# Altium PCB flight controller.PcbDoc (part 3 of 3)
Units mm, origin at the board's own origin, x right, y up, seen from the top; angles counter-clockwise.
Board outline 45 x 47 mm, 6 copper layers (Top Layer, GND Layer, PWR Layer, Layer 4, Layer 5, Bottom Layer), stack 1.786 mm thick; 82 components, 123 nets, 711 pads, 295 vias.
Unrouted connection lines stored in the file: 14.
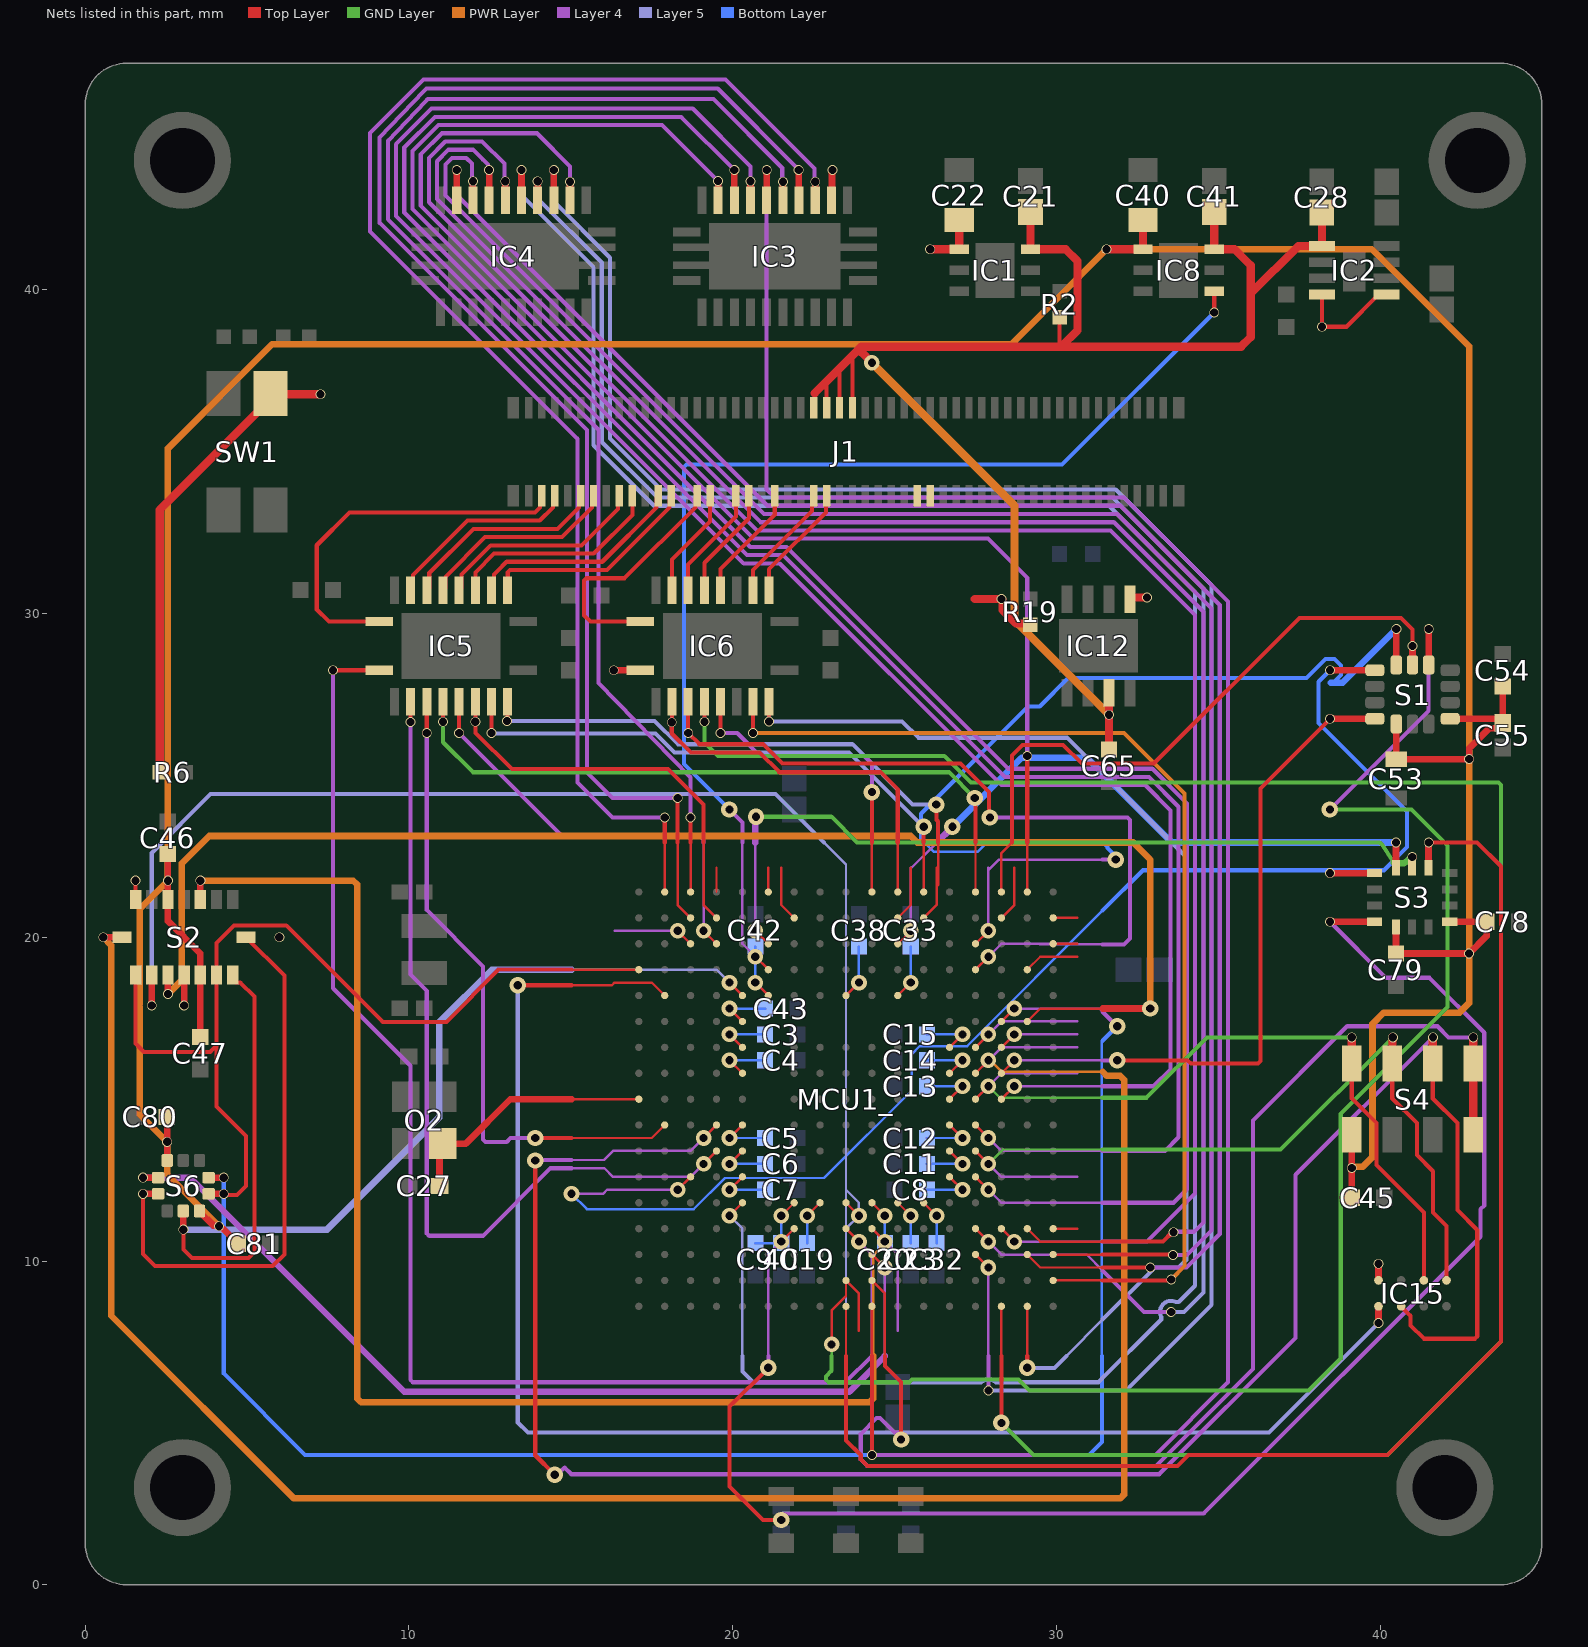
[diagram p6: the nets of this part, all layers, seen from the top]

## Via types
v1: diameter 0.483, hole 0.254, Top Layer to Layer 4, 88 vias
v2: diameter 0.305, hole 0.254, Top Layer to Layer 5, 60 vias
v3: diameter 0.305, hole 0.254, Top Layer to PWR Layer, 28 vias
v4: diameter 0.483, hole 0.254, Top Layer to Bottom Layer, 27 vias
v5: diameter 0.483, hole 0.254, Top Layer to GND Layer, 26 vias
v6: diameter 0.305, hole 0.254, Top Layer to Bottom Layer, 14 vias
v7: diameter 0.483, hole 0.254, Top Layer to Layer 5, 12 vias
v8: diameter 0.508, hole 0.254, Top Layer to Layer 4, 11 vias
v9: diameter 0.305, hole 0.254, Top Layer to Layer 4, 9 vias
v10: diameter 0.508, hole 0.254, Top Layer to Bottom Layer, 6 vias
v11: diameter 0.483, hole 0.254, Top Layer to PWR Layer, 6 vias
v12: diameter 0.508, hole 0.254, Top Layer to Layer 5, 4 vias
v13: diameter 0.508, hole 0.254, Top Layer to GND Layer, 3 vias
v14: diameter 0.508, hole 0.254, Top Layer to PWR Layer, 1 vias

## Nets (pads, with @x,y where several pads share a name; then routed paths per layer and width w, separated by ;. In a path a pad name is that pad's centre, name@x,y a point inside that pad or via, vN(x,y) a via of type N, cw(c..) or ccw(c..) an arc to the next point about the centre after c; other vN are vias at no path point) (continued)
PH1_OSC_OUT: C27.1 MCU1_.J1 O2.1 | length 8
  Top Layer w0.076: 15.021,15 16.352,15 16.726,15 MCU1_.J1@17.1,15
  Top Layer w0.203: C27.1@10.943,12.319 10.943,13.527 O2.1@11.043,13.627 11.758,13.627 13.131,15 15.021,15
SPI1_DRDY_ICM45686: MCU1_.P7 S3.4 | length 50.7
  Top Layer w0.076: v1(21.5,10.6) MCU1_.P7@21.9,11
  Top Layer w0.127: v8(21.1,6.701) 19.9,5.501 19.9,3.035 20.935,2 v8(21.5,2)
  Top Layer w0.203: v2(38.45,20.481) S3.4@39.828,20.481
  Layer 4 w0.076: 21.1,7.071 21.1,8.537 ; 21.1,7.852 21.1,8.537 ; v1(21.5,10.6) 21.1,10.2 21.1,8.537
  Layer 4 w0.127: v8(21.1,6.701) 21.1,7.071 ; v8(21.5,2) 21.554,2.054 21.554,2.2 34.55,2.2 43.1,10.75 43.1,11.6 43.218,11.718 43.218,17.052 41.52,18.749 40.181,18.749 v2(38.45,20.481)
SPI1_MISO: MCU1_.B7 S3.1 | length 3.1
  Top Layer w0.076: 21.5,22.148 21.5,21 MCU1_.B7@21.9,20.6
  Top Layer w0.203: v2(38.45,21.981) S3.1@39.828,21.981
SPI1_MOSI: MCU1_.C11 S3.14 | length 20.8
  Top Layer w0.076: MCU1_.C11@25.1,19.8 v1(25.5,20.2)
  Top Layer w0.203: S3.14@40.49,22.143 v6(40.49,22.929)
  Layer 4 w0.076: v1(25.5,20.2) 25.5,22.075 ; 25.5,22.148 25.5,22.075 ; 26.306,22.929 25.5,22.123 25.5,22.075
  Layer 4 w0.203: 26.306,22.929 v10(26.789,23.412)
  Bottom Layer w0.203: v10(26.789,23.412) 28.924,25.547 30.944,25.547 33.562,22.929 v6(40.49,22.929)
SPI1_nCS_ICM45686: MCU1_.U9 S3.12 | length 45.1
  Top Layer w0.076: 23.5,7.071 MCU1_.U9@23.5,8.6 23.5,7.852
  Top Layer w0.127: 23.5,7.071 23.5,4.457 23.957,4 23.957,3.869 24.158,3.668 33.742,3.668 34.085,4.011 40.226,4.011 43.729,7.514 43.729,22.194 42.995,22.929 v2(41.5,22.929)
  Top Layer w0.203: S3.12@41.49,22.143 41.495,22.148 41.495,22.924 v2(41.5,22.929)
SPI1_SCK: MCU1_.C6 S3.13 | length 26.4
  Top Layer w0.076: v1(20.7,20.2) MCU1_.C6@21.1,19.8
  Top Layer w0.203: S3.13@40.99,22.143 v2(40.99,22.481)
  Layer 4 w0.076: v1(20.7,20.2) 20.7,21.174 ; 20.7,22.148 20.7,21.174 ; 20.7,22.929 20.7,21.174
  Layer 4 w0.203: 20.7,22.929 20.7,23.705 v8(20.72,23.725)
  GND Layer w0.127: v8(20.72,23.725) 23.045,23.725 23.841,22.929 31.429,22.929 39.972,22.929 40.016,22.906 40.067,22.855 40.419,22.311
  GND Layer w0.203: 40.419,22.311 40.649,22.281 40.732,22.281 v2(40.99,22.481)
SPI2_DRDY_ICM42688P: MCU1_.H15 S1.4 | length 21.2
  Top Layer w0.076: MCU1_.H15@28.3,15.8 v1(28.7,16.2)
  Top Layer w0.127: v8(31.877,16.2) 34.053,16.2 34.153,16.1 36.226,16.1 36.3,16.174 36.3,24.6 v6(38.45,26.75)
  Top Layer w0.203: v6(38.45,26.75) S1.4@39.835,26.75
  Layer 4 w0.076: v1(28.7,16.2) 30.575,16.2 ; 30.648,16.2 30.575,16.2 ; 31.429,16.2 30.575,16.2
  Layer 4 w0.127: 31.429,16.2 v8(31.877,16.2)
SPI2_MISO: MCU1_.M3 S1.1 | length 43.3
  Top Layer w0.076: v1(18.3,12.2) MCU1_.M3@18.7,12.6
  Top Layer w0.203: v6(38.45,28.25) S1.1@39.835,28.25
  Layer 4 w0.076: v4(15.021,12.075) 15.998,12.075 16.123,12.2 16.352,12.2 16.425,12.2 v1(18.3,12.2)
  Bottom Layer w0.076: v4(15.021,12.075) 15.495,11.601 18.798,11.601 19.761,12.564 22.826,12.564 25.536,15.274 25.536,16.397 25.774,16.636 27.239,16.636 31.429,20.826
  Bottom Layer w0.127: 31.429,20.826 32.674,22.071 40.117,22.071 40.632,22.586 40.833,22.787 40.833,23.071 40.833,23.882 38.095,26.62 38.095,27.895 v6(38.45,28.25)
SPI2_MOSI: MCU1_.C14 S1.14 | length 33.5
  Top Layer w0.076: MCU1_.C14@27.5,19.8 v1(27.9,20.2)
  Top Layer w0.203: S1.14@40.5,28.415 v6(40.5,29.525)
  Layer 4 w0.076: v1(27.9,20.2) 27.9,22.075 ; 27.9,22.148 27.9,22.075 ; 31.429,22.4 28.225,22.4 27.9,22.075
  Layer 4 w0.127: 31.429,22.4 v10(31.83,22.4)
  Bottom Layer w0.076: 25.925,22.929 26.217,22.637 27.564,22.637 27.856,22.929
  Bottom Layer w0.127: 25.925,22.929 25.814,23.039 25.814,23.817 29.126,27.129 29.486,27.129 30.364,28.008 37.723,28.008 38.308,28.593 38.592,28.593 38.793,28.392 38.793,28.108 38.592,27.907 38.52,27.907 38.482,27.869 ; 27.856,22.929 27.895,22.967 31.391,22.967 31.574,22.784 31.574,22.759 31.83,22.503 v10(31.83,22.4)
  Bottom Layer w0.203: 38.482,27.869 38.844,27.869 v6(40.5,29.525)
SPI2_nCS_ICM42688P: MCU1_.T9 S1.12 | length 50.8
  Top Layer w0.076: v5(23.056,7.425) 23.056,8.476 23.5,8.921 MCU1_.T9@23.5,9.4 23.9,9 23.9,7.852
  Top Layer w0.203: S1.12@41.5,28.415 v6(41.5,29.525)
  Layer 4 w0.127: v8(38.45,23.948) 41.5,26.997 v6(41.5,29.525)
  GND Layer w0.076: 23.056,7.071 v5(23.056,7.425)
  GND Layer w0.127: 23.056,7.071 23.056,6.612 22.88,6.436 22.88,6.331 22.954,6.256 25.455,6.256 25.541,6.343 28.829,6.343 29.172,6 37.791,6 38.782,6.991 38.782,14.545 42.081,17.844 42.081,22.833 40.966,23.948 v8(38.45,23.948)
SPI2_SCK: MCU1_.A15 S1.13 | length 20.2
  Top Layer w0.076: MCU1_.A15@28.3,21.4 28.3,22.075 28.3,22.6 28.629,22.929
  Top Layer w0.127: 28.629,22.929 28.629,25.614 28.958,25.943 30.207,25.943 30.786,25.364 33.006,25.364 37.51,29.868 40.642,29.868 41,29.51 v6(41,29)
  Top Layer w0.203: S1.13@41,28.415 v6(41,29)
SPI4_DRDY_BMI088_ACCEL1: MCU1_.H14 S2.16 | length 66.8
  Top Layer w0.076: MCU1_.H14@27.5,15.8 v1(27.9,16.2)
  Top Layer w0.203: v2(0.554,20) S2.16@1.14,20
  Layer 4 w0.076: v1(27.9,16.2) 28.3,16.6 30.648,16.6
  PWR Layer w0.076: v1(27.9,16.2) 27.961,16.2 28.317,15.844 31.429,15.844
  PWR Layer w0.203: v2(0.554,20) 0.805,19.75 0.805,8.308 6.446,2.667 31.973,2.667 32.092,2.786 32.092,15.598 31.973,15.717 31.556,15.717 31.429,15.844
SPI4_DRDY_BMI088_ACCEL2: MCU1_.G14 S2.1 | length 4.1
  Top Layer w0.076: MCU1_.G14@27.5,16.6 v1(27.9,17)
  Top Layer w0.127: S2.1@1.554,21.165 v2(1.554,21.75)
  Layer 4 w0.076: v1(27.9,17) 28.3,17.4 30.648,17.4
SPI4_DRDY_BMI088_GYRO1: MCU1_.G15 S2.12 | length 3.5
  Top Layer w0.076: MCU1_.G15@28.3,16.6 v1(28.7,17)
  Top Layer w0.203: v2(3.055,17.89) S2.12@3.055,18.835
  Layer 4 w0.076: v1(28.7,17) 30.648,17
SPI4_DRDY_BMI088_GYRO2: MCU1_.F16 S2.13 | length 44
  Top Layer w0.076: MCU1_.F16@29.1,17.4 29.5,17.8 30.575,17.8 ; 30.648,17.8 30.575,17.8 ; 31.429,17.8 30.575,17.8
  Top Layer w0.203: v2(2.554,18.25) S2.13@2.554,18.835 ; 31.429,17.8 v14(32.9,17.8)
  PWR Layer w0.203: v2(2.554,18.25) 2.985,18.681 2.985,22.285 3.83,23.13 25.499,23.13 25.7,22.929 32.371,22.929 32.9,22.4 v14(32.9,17.8)
SPI4_DRDY_ICP20100: MCU1_.F15 S6.7 | length 51.9
  Top Layer w0.076: MCU1_.F15@28.3,17.4 v1(28.7,17.8)
  Top Layer w0.203: S6.7@3.81,12.575 v6(4.28,12.575)
  Layer 4 w0.076: v1(28.7,17.8) 30.575,17.8 ; 30.648,17.8 30.575,17.8 ; 31.429,17.701 31.33,17.8 30.575,17.8
  Layer 4 w0.127: 31.429,17.701 v10(31.877,17.253)
  Bottom Layer w0.076: 31.402,7.071 31.402,16.778 31.429,16.805
  Bottom Layer w0.127: v6(4.28,12.575) 4.28,6.52 6.789,4.011 31.001,4.011 31.402,4.413 31.402,7.071 ; 31.429,16.805 v10(31.877,17.253)
SPI4_MISO: MCU1_.D1 S2.10 S2.15 S6.6 | length 29.1
  Top Layer w0.076: 15.021,19 16.352,19 16.425,19 MCU1_.D1@17.1,19
  Top Layer w0.127: S2.15@1.554,18.835 1.554,16.719 1.819,16.455 3.859,16.455 4.06,16.655 4.06,14.775 4.97,13.865 4.97,12.319 4.691,12.041 4.313,12.041 v2(4.28,12.075) ; S2.10@4.055,18.835 4.055,19.824 4.596,20.365 6.209,20.365 9.191,17.384 11.153,17.384 12.769,19 15.021,19 ; 4.06,16.66 S2.10@4.06,18.83
  Top Layer w0.203: S6.6@3.81,12.075 v2(4.28,12.075)
SPI4_MOSI: MCU1_.E5 S2.9 S6.4 | length 35.1
  Top Layer w0.076: v7(19.9,18.6) MCU1_.E5@20.3,18.2
  Top Layer w0.127: v2(3.03,10.969) 3.03,10.359 3.294,10.095 5.044,10.095 5.224,10.274 5.224,18.166 4.786,18.603 4.666,18.603 4.554,18.715 S2.9@4.554,18.835
  Top Layer w0.203: v2(3.03,10.969) 3.03,11.197 S6.4@3.03,11.545
  Layer 5 w0.076: 15.021,19 16.352,19 17.162,19 19.5,19 v7(19.9,18.6)
  Layer 5 w0.203: v2(3.03,10.969) 7.469,10.969 10.93,14.43 10.93,17.372 12.558,19 15.021,19
SPI4_nCS_BMI088_ACCEL: MCU1_.N9 S2.14 | length 45.3
  Top Layer w0.076: MCU1_.N9@23.5,11.8 v7(23.9,11.4)
  Top Layer w0.203: v2(2.055,17.89) S2.14@2.055,18.835
  Layer 5 w0.076: 22.816,22.929 23.5,22.245 23.5,12.2 ; 23.5,7.852 23.5,11 ; 23.5,11 v7(23.9,11.4) 23.9,11.8 23.5,12.2 ; 23.5,11 23.5,12.2
  Layer 5 w0.127: v2(2.055,17.89) 2.055,22.607 3.872,24.425 21.32,24.425 22.816,22.929
SPI4_nCS_BMI088_GYRO: MCU1_.P10 S2.5 | length 45.9
  Top Layer w0.076: MCU1_.P10@24.3,11 v1(24.7,10.6)
  Top Layer w0.203: S2.5@3.554,21.165 v2(3.554,21.75)
  Layer 4 w0.076: v1(24.7,10.6) 25.1,10.2 25.1,7.852
  PWR Layer w0.076: 24.344,7.071 24.344,10.183 24.7,10.539 v1(24.7,10.6)
  PWR Layer w0.203: v2(3.554,21.75) 8.281,21.75 8.4,21.631 8.4,5.754 8.519,5.635 24.225,5.635 24.344,5.754 24.344,7.071
SPI4_nCS_ICP20100: MCU1_.R10 S6.1 | length 30
  Top Layer w0.076: MCU1_.R10@24.3,10.2 v1(24.7,9.8)
  Top Layer w0.203: v2(1.78,12.575) S6.1@2.25,12.575
  Layer 4 w0.076: 24.7,7.071 24.7,7.925 ; 24.7,7.852 24.7,7.925 ; v1(24.7,9.8) 24.7,7.925
  Layer 4 w0.203: v2(1.78,12.575) 3.241,12.575 9.852,5.964 23.606,5.964 24.7,7.058 24.7,7.071
SPI4_SCK: MCU1_.C3 S2.8 S6.2 | length 19.8
  Top Layer w0.076: v1(18.3,20.2) MCU1_.C3@18.7,19.8
  Top Layer w0.127: v2(1.78,12.075) 1.78,10.216 2.155,9.841 5.79,9.841 6.156,10.206 6.156,18.814 S2.8@4.97,20
  Top Layer w0.203: v2(1.78,12.075) S6.2@2.25,12.075
  Layer 4 w0.076: 16.352,20.2 v1(18.3,20.2)
  other v2: 5.995,20
SPI5_MISO: IC15.4 MCU1_.K4 S4.6 | length 65.6
  Top Layer w0.076: v1(19.1,13.8) MCU1_.K4@19.5,14.2
  Top Layer w0.127: v8(13.9,13.105) 13.9,4 v8(14.5,3.4) ; IC15.4@40.65,8.6 40.942,8.308 40.942,8.008 41.35,7.6 42.926,7.6 43,7.674 43,10.956 42.384,11.572 42.384,14.26 41.625,15.019 S4.6@41.625,16.1
  Top Layer w0.254: S4.6@41.625,16.1 41.628,16.104 41.628,16.906 v2(41.632,16.91)
  Layer 4 w0.076: 15.021,13.121 16.023,13.121 16.302,13.4 17.778,13.4 ; 16.856,13.4 17.778,13.4 ; v1(19.1,13.8) 18.7,13.4 17.778,13.4
  Layer 4 w0.127: v8(13.9,13.105) 13.916,13.121 15.021,13.121 ; v8(14.5,3.4) 14.595,3.4 14.811,3.615 15.012,3.414 33.176,3.414 37.387,7.625 37.387,12.665 v2(41.632,16.91)
SPI5_MOSI: IC15.7 MCU1_.L14 S4.7 | length 25.8
  Top Layer w0.076: MCU1_.L14@27.5,13.4 v1(27.9,13)
  Top Layer w0.127: S4.7@40.375,16.1 40.375,15.019 41.135,14.26 41.135,13.271 41.632,12.774 41.632,11.498 42.05,11.08 IC15.7@42.05,9.4
  Top Layer w0.254: S4.7@40.375,16.1 40.384,16.109 40.384,16.901 v2(40.393,16.91)
  Layer 4 w0.076: v1(27.9,13) 28.3,12.6 30.648,12.6
  GND Layer w0.076: v1(27.9,13) 28.344,13.444 31.429,13.444
  GND Layer w0.127: 31.429,13.444 36.927,13.444 v2(40.393,16.91)
SPI5_nCS_EEPROM: IC15.2 MCU1_.E2 | length 46.9
  Top Layer w0.076: 15.021,18.517 16.27,18.517 16.352,18.6 16.926,18.6 17.5,18.6 MCU1_.E2@17.9,18.2
  Top Layer w0.127: v12(13.361,18.517) 15.021,18.517
  Top Layer w0.203: v2(39.95,8.085) 39.95,8.313 IC15.2@39.95,8.6
  Layer 5 w0.127: v12(13.361,18.517) 13.361,5.014 13.674,4.7 36.565,4.7 v2(39.95,8.085)
SPI5_nCS_MS5611: MCU1_.T10 S4.4 S4.5 | length 40.2
  Top Layer w0.076: MCU1_.T10@24.3,9.4 24.7,9 24.7,8.426 24.7,7.852 24.7,7.071
  Top Layer w0.127: 24.7,7.071 24.7,6.758 25.2,6.258 v8(25.2,4.486)
  Top Layer w0.254: S4.4@42.875,13.9 S4.5@42.875,16.1 v2(42.875,16.91)
  Layer 4 w0.127: v8(25.2,4.486) 25.16,4.526 25.16,4.7 25,4.7 24.553,5.147 24.447,5.147 23.957,4.657 23.957,3.869 24.158,3.668 33.071,3.668 36.071,6.668 36.071,14.341 38.983,17.253 41.774,17.253 42.117,16.91 v2(42.875,16.91)
SPI5_SCK: IC15.5 MCU1_.J14 S4.8 | length 24.1
  Top Layer w0.076: MCU1_.J14@27.5,15 v1(27.9,15.4)
  Top Layer w0.127: S4.8@39.125,16.1 39.125,15.019 39.885,14.26 39.885,12.964 41.35,11.498 IC15.5@41.35,9.4
  Top Layer w0.254: S4.8@39.125,16.1 v2(39.125,16.91)
  Layer 4 w0.076: v1(27.9,15.4) 28.3,15.8 30.648,15.8
  GND Layer w0.076: v1(27.9,15.4) 28.256,15.044 31.429,15.044
  GND Layer w0.127: 31.429,15.044 32.782,15.044 34.647,16.91 v2(39.125,16.91)
TIM1_CH1: IC3.8 MCU1_.J15 | length 60.5
  Top Layer w0.076: MCU1_.J15@28.3,15 v1(28.7,15.4)
  Top Layer w0.203: IC3.8@20.55,42.765 v2(20.55,43.356)
  Layer 4 w0.076: v1(28.7,15.4) 30.575,15.4 30.648,15.4 31.429,15.4
  Layer 4 w0.127: v2(20.55,43.356) 20.55,43.816 18.766,45.6 10.7,45.6 9.6,44.5 9.6,42.286 20.34,31.546 21.454,31.546 28.3,24.7 32.744,24.7 33.522,23.922 33.522,15.915 33.007,15.4 31.429,15.4
TIM1_CH2: IC3.9 MCU1_.K14 | length 62.7
  Top Layer w0.076: MCU1_.K14@27.5,14.2 v1(27.9,13.8)
  Top Layer w0.203: IC3.9@20.05,42.765 v2(20.05,43.705)
  Layer 4 w0.076: v1(27.9,13.8) 28.3,13.4 29.963,13.4 30.648,13.4 31.429,13.4
  Layer 4 w0.127: v2(20.05,43.705) 18.409,45.346 10.805,45.346 9.854,44.395 9.854,42.391 20.438,31.807 21.552,31.807 28.405,24.954 32.855,24.954 33.776,24.033 33.776,13.823 33.353,13.4 31.429,13.4
TIM1_CH3: IC3.10 MCU1_.M14 | length 63.4
  Top Layer w0.076: MCU1_.M14@27.5,12.6 v1(27.9,12.2)
  Top Layer w0.203: v2(19.547,43.36) 19.549,43.359 19.549,42.766 IC3.10@19.55,42.765
  Layer 4 w0.076: v1(27.9,12.2) 28.3,11.8 29.963,11.8 30.648,11.8 31.429,11.8
  Layer 4 w0.127: v2(19.547,43.36) 17.815,45.092 10.91,45.092 10.108,44.29 10.108,42.496 20.543,32.061 21.657,32.061 28.51,25.208 32.96,25.208 34.03,24.138 34.03,12.217 33.613,11.8 31.429,11.8
TIM1_CH4: IC3.7 MCU1_.U10 | length 67.1
  Top Layer w0.076: 24.3,7.071 24.3,7.852 24.3,8.226 MCU1_.U10@24.3,8.6
  Top Layer w0.127: v9(24.3,4.011) 24.3,7.071
  Top Layer w0.203: IC3.7@21.05,42.765 v2(21.05,43.705)
  Layer 4 w0.127: v2(21.05,43.705) 21.05,33.835 21.3,33.585 32.087,33.585 35.3,30.372 35.3,6.256 33.055,4.011 v9(24.3,4.011)
TIM4_CH1: IC4.10 MCU1_.R16 | length 56.5
  Top Layer w0.076: MCU1_.R16@29.1,10.2 29.5,9.8 30.074,9.8 30.648,9.8 31.429,9.8
  Top Layer w0.127: 31.429,9.8 v9(32.9,9.8)
  Top Layer w0.203: IC4.10@11.475,42.765 v2(11.475,43.705)
  Layer 4 w0.127: v2(11.475,43.705) 11.475,42.925 21.069,33.331 31.982,33.331 35.046,30.267 35.046,10.833 34.013,9.8 v9(32.9,9.8)
TIM4_CH2: IC4.9 MCU1_.R17 | length 56.5
  Top Layer w0.076: MCU1_.R17@29.9,10.2 30.274,10.2 30.648,10.2 31.429,10.2
  Top Layer w0.127: 31.429,10.2 33.583,10.2 v9(33.6,10.183)
  Top Layer w0.203: IC4.9@11.975,42.765 v2(11.975,43.356)
  Layer 4 w0.127: v2(11.975,43.356) 11.945,43.386 11.945,43.9 11.769,44.076 11.331,44.076 11.124,43.869 11.124,42.917 20.964,33.077 31.877,33.077 34.792,30.162 34.792,10.938 34.037,10.183 v9(33.6,10.183)
TIM4_CH3: IC4.8 MCU1_.P16 | length 57.9
  Top Layer w0.076: MCU1_.P16@29.1,11 29.5,10.6 30.161,10.6 30.648,10.6 31.429,10.6
  Top Layer w0.127: 31.429,10.6 33.29,10.6 33.578,10.888 v9(33.618,10.888)
  Top Layer w0.203: IC4.8@12.475,42.765 v2(12.475,43.705)
  Layer 4 w0.127: v2(12.475,43.705) 12.441,43.739 12.441,43.871 12.275,44.036 11.982,44.33 11.226,44.33 10.87,43.974 10.87,42.812 20.859,32.823 31.772,32.823 34.538,30.057 34.538,11.192 34.249,10.903 33.632,10.903 v9(33.618,10.888)
TIM4_CH4: IC4.7 MCU1_.P15 | length 58.9
  Top Layer w0.076: MCU1_.P15@28.3,11 v1(28.7,10.6)
  Top Layer w0.203: IC4.7@12.975,42.765 v2(12.975,43.356)
  Layer 4 w0.076: v1(28.7,10.6) 29.674,10.6 30.648,10.6 31.429,10.6
  Layer 4 w0.127: v2(12.975,43.356) 12.945,43.386 12.945,43.9 12.261,44.584 11.121,44.584 10.616,44.079 10.616,42.706 20.753,32.569 31.667,32.569 34.284,29.952 34.284,12.084 32.8,10.6 31.429,10.6
TIM5_CH1: IC4.6 MCU1_.N5 | length 75.6
  Top Layer w0.076: v7(19.9,11.4) MCU1_.N5@20.3,11.8
  Top Layer w0.203: IC4.6@13.475,42.765 v2(13.475,43.705)
  Layer 5 w0.076: v7(19.9,11.4) 20.3,11 20.3,9.177 ; 20.3,7.071 20.3,7.852 ; 20.3,7.852 20.3,9.177 ; 20.3,7.852 20.3,9.177
  Layer 5 w0.127: v2(13.475,43.705) 13.475,42.925 15.7,40.7 15.7,35.2 17.569,33.331 31.623,33.331 34.284,30.67 34.284,9.237 33.78,8.732 33.727,8.732 33.699,8.732 ; 20.3,7.071 20.3,6.581 20.625,6.256 27.672,6.256 cw(c27.9,6) 28.128,6.256 31.304,6.256 33.238,8.191 33.238,8.243 33.238,8.271 cw(c33.544,8.426) 33.699,8.732 ; 33.238,8.271 cw(c33.544,8.426) 33.699,8.732
TIM5_CH2: IC4.5 MCU1_.P14 | length 60
  Top Layer w0.076: MCU1_.P14@27.5,11 v1(27.9,10.6)
  Top Layer w0.203: IC4.5@13.975,42.765 v2(13.975,43.356)
  Layer 4 w0.076: v1(27.9,10.6) 28.3,10.2 29.474,10.2 30.585,10.2 30.648,10.2 30.936,10.2 31.429,9.707
  Layer 4 w0.127: 31.429,9.707 32.71,8.426 v2(33.544,8.426)
  Layer 5 w0.127: v2(13.975,43.356) 13.975,42.825 15.954,40.846 15.954,35.305 17.674,33.585 31.728,33.585 34.538,30.775 34.538,9.023 33.941,8.426 v2(33.544,8.426)
TIM5_CH3: IC4.4 MCU1_.R14 | length 65.6
  Top Layer w0.076: MCU1_.R14@27.5,10.2 v1(27.9,9.8)
  Top Layer w0.203: IC4.4@14.475,42.765 v2(14.475,43.705)
  Layer 4 w0.076: 27.9,7.071 27.9,8.426 ; 27.9,7.852 27.9,8.426 ; v1(27.9,9.8) 27.9,8.426
  Layer 4 w0.127: v2(27.9,6) 27.9,7.071
  Layer 5 w0.127: v2(14.475,43.705) 14.475,42.725 16.208,40.992 16.208,35.41 17.779,33.839 31.833,33.839 34.792,30.88 34.792,8.648 32.144,6 v2(27.9,6)
TIM5_CH4: IC4.3 MCU1_.A16 | length 41.5
  Top Layer w0.076: MCU1_.A16@29.1,21.4 29.1,21.774 ; 29.1,22.929 29.1,22.148 ; 29.1,21.774 29.1,22.148 ; 29.1,21.774 29.1,22.148
  Top Layer w0.127: 29.1,22.929 v9(29.1,25.6)
  Top Layer w0.203: IC4.3@14.975,42.765 v2(14.975,43.339)
  Layer 4 w0.127: v2(14.975,43.339) 14.975,43.816 13.953,44.838 11.016,44.838 10.362,44.184 10.362,42.601 20.648,32.315 27.885,32.315 29.1,31.1 v9(29.1,25.6)
TIM8_CH1: IC3.6 MCU1_.A3 | length 41.7
  Top Layer w0.076: MCU1_.A3@18.7,21.4 18.7,21.774 18.7,22.075 18.7,22.148 18.7,22.929
  Top Layer w0.127: 18.7,22.929 v9(18.7,23.7)
  Top Layer w0.203: IC3.6@21.55,42.765 v2(21.55,43.339)
  Layer 4 w0.127: 14.847,36.68 9.346,42.18 9.346,44.605 10.505,45.818 10.579,45.892 19.402,45.892 21.531,43.763 v2@21.531,43.359 ; 14.848,36.678 15.847,35.68 15.854,35.665 15.854,27.861 18.7,24.943 v9(18.7,23.7)
  Layer 4 w0.203: v2@21.531,43.359 v2(21.55,43.339)
TIM8_CH2: IC3.4 MCU1_.A2 | length 44.7
  Top Layer w0.076: MCU1_.A2@17.9,21.4 17.9,21.774 17.9,22.148 17.9,22.929
  Top Layer w0.127: 17.9,22.929 v9(17.9,23.7)
  Top Layer w0.203: IC3.4@22.55,42.765 v2(22.55,43.339)
  Layer 4 w0.127: v9(17.9,23.7) 16.284,23.7 15.2,24.784 15.2,35.4 8.8,41.8 8.8,44.846 10.454,46.5 19.782,46.5 22.531,43.751 v2@22.531,43.359
  Layer 4 w0.203: v2@22.531,43.359 v2(22.55,43.339)
TIM8_CH3: IC3.5 MCU1_.B3 | length 44.9
  Top Layer w0.076: 18.3,22.929 18.3,22.148 18.3,21.774 18.3,21 MCU1_.B3@18.7,20.6
  Top Layer w0.127: 18.3,22.929 v9(18.3,24.302)
  Top Layer w0.203: v2@22.044,43.716 22.044,42.771 IC3.5@22.05,42.765
  Layer 4 w0.127: v9(18.3,24.302) 16.284,24.302 15.495,25.092 15.495,35.672 9.107,42.061 9.092,42.061 9.092,44.71 10.461,46.148 10.536,46.222 19.539,46.222 v2@22.038,43.723
  Layer 4 w0.203: v2(22.038,43.705) v2@22.038,43.723
TIM8_CH4: IC3.3 MCU1_.B15 | length 2.7
  Top Layer w0.076: MCU1_.B15@28.3,20.6 28.7,21 28.7,22.148
  Top Layer w0.203: IC3.3@23.05,42.765 23.067,42.782 23.067,43.707 v2@23.084,43.724
  other v2: 23.084,43.705
UART4_RX: J1.61 MCU1_.B17 | length 0.7
  Top Layer w0.076: MCU1_.B17@29.9,20.6 30.648,20.6
UART4_TX: J1.63 MCU1_.D16 | length 1.7
  Top Layer w0.076: MCU1_.D16@29.1,19 29.5,19.4 30.648,19.4
UART7_CTS: IC5.3 MCU1_.L4 | length 27.6
  Top Layer w0.076: v1(19.1,13) MCU1_.L4@19.5,13.4
  Top Layer w0.127: v2(10.044,26.647) 10.047,26.651 IC5.3@10.047,27.272
  Layer 4 w0.076: 15.021,12.867 16.035,12.867 16.302,12.6 17.038,12.6 ; 16.352,12.6 17.038,12.6 ; v1(19.1,13) 18.7,12.6 17.038,12.6
  Layer 4 w0.127: v2(10.044,26.647) 10.044,18.853 10.55,18.346 10.55,10.854 10.624,10.78 12.286,10.78 14.373,12.867 15.021,12.867
UART7_CTS_TELEM2: IC5.18 J1.5 | length 6.1
  Top Layer w0.127: IC5.18@10.05,30.725 10.126,30.801 10.126,31.188 11.809,32.871 14.04,32.871 14.449,33.279 14.449,33.594 J1.5@14.5,33.645
UART7_RTS: IC5.1 MCU1_.P9 | length 44
  Top Layer w0.076: MCU1_.P9@23.5,11 v1(23.9,10.6)
  Top Layer w0.127: v2(7.65,28.25) IC5.1@9.075,28.25
  Layer 4 w0.076: v1(23.9,10.6) 24.3,10.2 24.3,8.662 ; 24.3,7.071 24.3,8.662 ; 24.3,7.852 24.3,8.537 24.3,8.662
  Layer 4 w0.127: v2(7.65,28.25) 7.65,18.426 10.044,16.032 10.044,6.331 10.118,6.256 23.485,6.256 24.3,7.071
UART7_RTS_TELEM2: IC5.20 J1.3 | length 11.8
  Top Layer w0.127: IC5.20@9.075,29.75 7.524,29.75 7.15,30.124 7.15,32.111 8.164,33.125 13.894,33.125 14.049,33.279 14.049,33.594 J1.3@14.1,33.645
UART7_RX: IC5.4 MCU1_.K2 | length 21.2
  Top Layer w0.076: 15.021,13.8 16.926,13.8 ; MCU1_.K2@17.9,14.2 17.5,13.8 16.926,13.8 ; 16.926,13.8 16.352,13.8 16.926,13.8
  Top Layer w0.127: v2(10.55,26.308) IC5.4@10.55,27.275 ; v8(13.9,13.8) 15.021,13.8
  Layer 4 w0.127: v2(10.55,26.308) 10.55,20.839 12.286,19.102 12.286,13.756 12.361,13.681 13.019,13.681 13.138,13.8 v8(13.9,13.8)
UART7_RX_TELEM2: IC5.17 J1.9 | length 6.4
  Top Layer w0.127: IC5.17@10.55,30.725 10.627,30.801 10.627,31.255 11.988,32.617 14.586,32.617 15.248,33.279 15.248,33.594 J1.9@15.3,33.645
UART7_TX: IC5.5 MCU1_.A14 | length 21.3
  Top Layer w0.076: MCU1_.A14@27.5,21.4 27.5,21.774 27.5,22.148 27.5,22.929
  Top Layer w0.127: v2(11.05,26.657) IC5.5@11.05,27.275 ; v13(27.475,24.302) 27.5,24.277 27.5,22.929
  GND Layer w0.127: v2(11.05,26.657) 11.05,26.025 11.975,25.1 26.677,25.1 v13(27.475,24.302)
UART7_TX_TELEM2: IC5.16 J1.11 | length 6.2
  Top Layer w0.127: IC5.16@11.05,30.725 11.126,30.801 11.126,31.136 12.353,32.363 14.732,32.363 15.648,33.279 15.648,33.594 J1.11@15.7,33.645
UART8_RX: IC5.6 MCU1_.C4 | length 13.3
  Top Layer w0.076: v1(19.1,20.2) MCU1_.C4@19.5,19.8
  Top Layer w0.127: v2(11.55,26.308) IC5.6@11.55,27.275
  Layer 4 w0.076: v1(19.1,20.2) 19.1,22.929
  Layer 4 w0.127: v2(11.55,26.308) 14.758,23.1 19.026,23.1 19.1,23.026 19.1,22.929
UART8_RX_GPS2: IC5.15 J1.15 | length 6.6
  Top Layer w0.127: IC5.15@11.55,30.725 11.627,30.801 11.627,31.209 11.758,31.34 ; 11.758,31.342 12.525,32.109 15.329,32.109 16.453,33.232 16.453,33.598 J1.15@16.5,33.645
UART8_TX: IC5.7 MCU1_.B4 | length 13.2
  Top Layer w0.076: 19.1,22.148 19.1,21.574 ; 19.1,22.929 19.1,21.574 ; MCU1_.B4@19.5,20.6 19.1,21 19.1,21.574
  Top Layer w0.127: IC5.7@12.05,27.275 v2(12.05,26.657) 12.059,26.648 12.059,26.314 13.179,25.195 18.005,25.195 19.1,24.1 19.1,22.929
UART8_TX_GPS2: IC5.14 J1.17 | length 6.7
  Top Layer w0.127: IC5.14@12.05,30.725 12.05,31.274 12.63,31.855 15.708,31.855 16.9,33.047 J1.17@16.9,33.645
USART1_RX: IC6.4 MCU1_.D14 | length 26.2
  Top Layer w0.076: MCU1_.D14@27.5,19 v1(27.9,19.4)
  Top Layer w0.127: IC6.4@18.625,27.275 v2(18.625,26.308) 18.968,25.965 20.933,25.965 21.534,25.364 27.035,25.364 27.652,24.747 27.659,24.747 27.919,24.486 27.919,23.725 v8(27.944,23.7)
  Layer 4 w0.076: v1(27.9,19.4) 28.3,19.8 29.474,19.8 ; 30.648,19.8 29.474,19.8 ; 31.429,19.78 30.648,19.78 29.494,19.78 29.474,19.8
  Layer 4 w0.127: v8(27.944,23.7) 32.201,23.7 32.275,23.626 32.275,19.967 32.087,19.78 31.429,19.78
USART1_RX_GPS1: IC6.17 J1.33 | length 3.5
  Top Layer w0.127: IC6.17@18.625,30.725 18.625,31.521 20.1,32.996 J1.33@20.1,33.645
USART1_TX: IC6.5 MCU1_.U15 | length 65.2
  Top Layer w0.076: 28.3,7.071 MCU1_.U15@28.3,8.6 28.3,7.852
  Top Layer w0.127: v2(19.125,26.657) IC6.5@19.125,27.275 ; v13(28.3,5) 28.3,7.071
  GND Layer w0.127: v2(19.125,26.657) 19.125,26.022 19.547,25.6 26.537,25.6 27.357,24.78 43.655,24.78 43.729,24.705 43.729,7.514 40.226,4.011 29.289,4.011 v13(28.3,5)
USART1_TX_GPS1: IC6.16 J1.35 | length 3.5
  Top Layer w0.127: IC6.16@19.125,30.725 19.125,31.571 20.5,32.946 J1.35@20.5,33.645
USART2_CTS: IC5.9 MCU1_.B12 | length 19.2
  Top Layer w0.076: MCU1_.B12@25.9,20.6 26.3,21 26.3,21.574 ; 26.3,22.148 26.3,21.574 ; 26.344,22.929 26.344,21.618 26.3,21.574
  Top Layer w0.127: v2(13.029,26.685) 13.04,26.695 IC5.9@13.04,27.265 ; v12(26.287,24.1) 26.3,24.087 26.3,23.629 26.344,23.584 26.344,22.929
  Layer 5 w0.127: v2(13.029,26.685) 17.589,26.685 18.309,25.965 23.694,25.965 25.559,24.1 v12(26.287,24.1)
USART2_CTS_TELEM1: IC5.12 J1.23 | length 6.8
  Top Layer w0.127: IC5.12@13.05,30.725 13.05,31.272 13.124,31.347 16.116,31.347 18.048,33.279 18.048,33.594 J1.23@18.1,33.645
USART2_RTS: IC5.8 MCU1_.A12 | length 17.9
  Top Layer w0.076: MCU1_.A12@25.9,21.4 25.9,21.774 ; 25.9,22.148 25.9,21.774 ; 25.9,22.929 25.9,21.774
  Top Layer w0.127: v2(12.55,26.308) IC5.8@12.55,27.275 ; 25.9,22.929 v12(25.9,23.412)
  Layer 5 w0.127: v2(12.55,26.308) 12.558,26.3 17.615,26.3 18.204,25.711 23.589,25.711 25.888,23.412 v12(25.9,23.412)
USART2_RTS_TELEM1: IC5.13 J1.21 | length 6.8
  Top Layer w0.127: IC5.13@12.55,30.725 12.627,30.801 12.627,31.208 12.719,31.301 13.019,31.601 15.97,31.601 17.648,33.279 17.648,33.594 J1.21@17.7,33.645
USART2_RX: IC6.1 MCU1_.B11 | length 2.5
  Top Layer w0.076: MCU1_.B11@25.1,20.6 25.5,21 25.5,22.148
  Top Layer w0.203: v2(16.325,28.25) IC6.1@17.15,28.25
USART2_RX_TELEM1: IC6.20 J1.27 | length 7.7
  Top Layer w0.127: IC6.20@17.15,29.75 15.607,29.75 15.412,29.945 15.412,31.018 15.487,31.093 16.662,31.093 18.848,33.279 18.848,33.594 J1.27@18.9,33.645
USART2_TX: IC6.3 MCU1_.A11 | length 11.8
  Top Layer w0.076: MCU1_.A11@25.1,21.4 25.1,21.774 25.1,22.148 25.1,22.929
  Top Layer w0.127: IC6.3@18.125,27.275 18.12,27.27 18.12,26.648 v2(18.116,26.643) 18.116,26.304 18.709,25.711 20.828,25.711 21.439,25.1 24.559,25.1 25.1,24.559 25.1,22.929
USART2_TX_TELEM1: IC6.18 J1.29 | length 3.4
  Top Layer w0.127: IC6.18@18.125,30.725 18.125,31.671 19.3,32.846 J1.29@19.3,33.645
USART3_RX: IC6.8 MCU1_.T17 | length 33.9
  Top Layer w0.076: MCU1_.T17@29.9,9.4 30.274,9.4 30.648,9.4 31.429,9.4
  Top Layer w0.127: v2(20.625,26.308) IC6.8@20.625,27.275 ; 31.429,9.4 33.515,9.4 v9(33.547,9.432)
  PWR Layer w0.127: v2(20.625,26.308) 32.092,26.308 33.961,24.439 33.961,9.846 v9(33.547,9.432)
USART3_RX_DEBUG: IC6.13 J1.45 | length 3.7
  Top Layer w0.127: IC6.13@20.625,30.725 20.625,31.34 22.448,33.164 22.448,33.594 J1.45@22.5,33.645
USART3_TX: IC6.9 MCU1_.U16 | length 36.3
  Top Layer w0.076: 29.1,7.071 29.1,8.226 ; 29.1,7.852 29.1,8.226 ; MCU1_.U16@29.1,8.6 29.1,8.226
  Top Layer w0.127: v2(21.117,26.667) 21.121,26.671 21.121,27.271 IC6.9@21.125,27.275 ; v12(29.1,6.701) 29.1,7.071
  Layer 5 w0.076: 30.312,7.071 31.429,8.188
  Layer 5 w0.127: v2(21.117,26.667) 25.234,26.667 25.735,26.166 30.325,26.166 34.01,22.481 34.01,10.031 33.78,9.8 33.041,9.8 31.429,8.188 ; v12(29.1,6.701) 29.942,6.701 30.312,7.071
USART3_TX_DEBUG: IC6.12 J1.47 | length 3.7
  Top Layer w0.127: IC6.12@21.125,30.725 21.125,31.371 22.879,33.125 22.879,33.624 J1.47@22.9,33.645
USART6_RX: IC6.6 MCU1_.A10 | length 10.4
  Top Layer w0.076: MCU1_.A10@24.3,21.4 24.3,21.774 ; 24.3,22.148 24.3,21.774 ; 24.3,22.929 24.3,21.774
  Top Layer w0.127: v2(19.625,26.308) IC6.6@19.625,27.275 ; 24.3,22.929 v8(24.3,24.486)
  Layer 4 w0.127: v2(19.625,26.308) 20.14,26.308 20.848,25.6 24.059,25.6 24.3,25.359 v8(24.3,24.486)
USART6_RX_SBUS_DSM: IC6.15 J1.39 | length 3.6
  Top Layer w0.127: IC6.15@19.625,30.725 19.625,31.383 21.3,33.058 J1.39@21.3,33.645
VDD_3V3_SENSORS_EN: IC8.4 MCU1_.D6 | length 35.7
  Top Layer w0.076: v1(20.7,19.4) MCU1_.D6@21.1,19
  Top Layer w0.127: v6(34.875,39.305) IC8.4@34.875,39.955
  Layer 4 w0.076: 20.3,22.148 20.3,22.075 ; 20.3,22.929 20.3,22.075 ; v1(20.7,19.4) 20.3,19.8 20.3,22.075
  Layer 4 w0.127: v10(19.9,23.948) 20.3,23.548 20.3,22.929
  Bottom Layer w0.127: v10(19.9,23.948) 18.5,25.348 18.5,34.526 18.574,34.6 30.17,34.6 v6(34.875,39.305)
VDD_5V_IN: C21.1 C28.1 C41.1 C65.1 IC1.6 IC2.1 IC8.6 IC12.3 J1.46 J1.48 J1.50 J1.52 R2.2 | length 50.4
  Top Layer w0.076: 19.5,21.4 19.5,22.148
  Top Layer w0.127: J1.46@22.5,36.355 22.535,36.39 22.535,36.808 ; J1.48@22.9,36.355 22.9,37.173 ; J1.50@23.3,36.355 23.3,37.573 ; J1.52@23.7,36.355 23.7,37.973 ; R2.2@30.1,39.155 30.1,38.295 30.15,38.245
  Top Layer w0.254: 22.535,36.808 22.917,37.19 ; 22.9,37.173 22.917,37.19 ; v11(24.3,37.747) 23.972,38.074 23.972,38.245 ; C21.1@29.2,42.408 IC1.6@29.2,41.255 30.285,41.255 30.648,40.892 30.648,38.743 30.15,38.245 ; C65.1@31.625,25.805 v3(31.625,26.875) IC12.3@31.625,27.55 ; C41.1@34.875,42.408 IC8.6@34.875,41.255 35.505,41.255 36,40.76 36,39.883 ; C28.1@38.2,42.385 IC2.1@38.2,41.355 37.472,41.355 36,39.883 ; 22.917,37.19 23.3,37.573 23.7,37.973 23.887,38.16 23.972,38.245 ; 23.972,38.245 30.15,38.245 ; 30.15,38.245 35.708,38.245 36,38.537 36,39.883
  PWR Layer w0.254: v11(24.3,37.747) 28.706,33.34 28.706,29.794 v3(31.625,26.875)
VDD_MCU: 40.1 C3.1 C4.1 C5.1 C6.1 C7.1 C8.1 C9.1 C11.1 C12.1 C13.1 C14.1 C15.1 C19.1 C20.1 C22.1 C23.1 C32.1 C33.1 C38.1 C42.1 C43.1 IC1.1 IC2.4 IC2.5 IC12.5 IC15.1 MCU1_.A6 MCU1_.C17 MCU1_.E6 MCU1_.E9 MCU1_.E11 MCU1_.F5 MCU1_.G5 MCU1_.G13 MCU1_.H5 MCU1_.H13 MCU1_.J13 MCU1_.K5 MCU1_.K13 MCU1_.L5 MCU1_.L13 MCU1_.M5 MCU1_.M13 MCU1_.N7 MCU1_.N8 MCU1_.N10 MCU1_.N11 MCU1_.N12 MCU1_.P17 R6.2 R19.2 SW1.1 | length 58.2
  Top Layer w0.076: v4(19.9,12.2) MCU1_.M5@20.3,12.6 ; v4(19.9,13) MCU1_.L5@20.3,13.4 ; v4(19.9,13.8) MCU1_.K5@20.3,14.2 ; v4(19.9,16.2) MCU1_.H5@20.3,15.8 ; v4(19.9,17) MCU1_.G5@20.3,16.6 ; v4(19.9,17.8) MCU1_.F5@20.3,17.4 ; v4(20.7,18.6) MCU1_.E6@21.1,18.2 ; MCU1_.A6@21.1,21.4 21.1,22.148 ; v4(21.5,11.4) MCU1_.N7@21.9,11.8 ; v4(22.3,11.4) MCU1_.N8@22.7,11.8 ; MCU1_.E9@23.5,18.2 v4(23.9,18.6) ; MCU1_.N10@24.3,11.8 v4(24.7,11.4) ; MCU1_.N11@25.1,11.8 v4(25.5,11.4) ; MCU1_.E11@25.1,18.2 v4(25.5,18.6) ; MCU1_.N12@25.9,11.8 v4(26.3,11.4) ; MCU1_.M13@26.7,12.6 v4(27.1,12.2) ; MCU1_.L13@26.7,13.4 v4(27.1,13) ; MCU1_.K13@26.7,14.2 v4(27.1,13.8) ; MCU1_.J13@26.7,15 v4(27.1,15.4) ; MCU1_.H13@26.7,15.8 v4(27.1,16.2) ; MCU1_.G13@26.7,16.6 v4(27.1,17) ; MCU1_.P17@29.9,11 30.648,11 ; MCU1_.C17@29.9,19.8 30.648,19.8
  Top Layer w0.127: IC2.4@38.2,39.855 v3(38.2,38.861) 38.955,38.861 39.95,39.855 IC2.5@40.2,39.855
  Top Layer w0.203: IC15.1@39.95,9.4 v3(39.95,9.915)
  Top Layer w0.254: R6.2@2.3,25.092 2.3,33.2 5.725,36.625 SW1.1@5.725,36.8 5.749,36.776 v3(7.27,36.776) ; v3(26.1,41.255) IC1.1@27,41.255 C22.1@27,42.055 ; 27.475,30.45 v3(28.3,30.45) 28.334,30.416 28.334,30.112 28.755,29.69 29.155,29.69 R19.2@29.195,29.65 ; IC12.5@32.275,30.45 32.275,30.452 32.323,30.5 v3(32.8,30.5)
  Bottom Layer w0.076: v4(19.9,12.2) C7.1@21,12.2 ; v4(19.9,13) C6.1@21,13 ; v4(19.9,13.8) C5.1@21,13.8 ; v4(19.9,16.2) C4.1@21,16.2 ; v4(19.9,17) 20.995,17 C3.1@21,16.995 ; v4(19.9,17.8) C43.1@21,17.8 ; C9.1@20.7,10.552 40.1@21.5,10.552 v4(21.5,11.4) ; v4(20.7,18.6) C42.1@20.7,19.712 ; C19.1@22.3,10.552 v4(22.3,11.4) ; v4(23.9,18.6) C38.1@23.9,19.712 ; C20.1@24.7,10.552 v4(24.7,11.4) ; C23.1@25.5,10.552 v4(25.5,11.4) ; v4(25.5,18.6) C33.1@25.5,19.712 ; C8.1@26,12.2 v4(27.1,12.2) ; C11.1@26,13 v4(27.1,13) ; C12.1@26,13.8 v4(27.1,13.8) ; C13.1@26,15.4 v4(27.1,15.4) ; C14.1@26,16.2 v4(27.1,16.2) ; C15.1@26,17 v4(27.1,17) ; C32.1@26.3,10.552 v4(26.3,11.4)
VDD_SENSOR: C40.1 C45.1 C46.1 C47.1 C53.1 C54.1 C55.1 C78.1 C79.1 C80.1 C81.1 IC8.1 S1.5 S1.8 S2.3 S2.11 S3.5 S3.8 S4.1 S6.5 S6.10 | length 124.2
  Top Layer w0.203: C80.1@2.515,14.452 2.529,14.438 v3(2.529,13.681) S6.10@2.529,13.105 ; C46.1@2.546,22.575 2.55,22.571 2.55,21.754 v2(2.554,21.75) S2.3@2.554,21.165 2.554,20.5 3.554,19.5 S2.11@3.554,18.835 C47.1@3.554,16.919 ; S6.5@3.529,11.545 3.529,11.525 3.96,11.094 4.11,11.094 v3(4.129,11.075) 4.149,11.056 4.194,11.056 C81.1@4.715,10.535 ; C45.1@39.125,11.954 v3(39.125,12.875) S4.1@39.125,13.9 ; C79.1@40.49,19.5 v3(42.749,19.5) 43.289,20.039 C78.1@43.289,20.481 S3.8@42.153,20.481 ; C79.1@40.49,19.5 S3.5@40.49,20.318 ; S1.5@40.5,26.585 40.5,25.505 40.501,25.504 42.749,25.504 v3(42.75,25.505) 42.75,25.831 43.381,26.463 43.63,26.463 43.669,26.501 43.669,26.75 S1.8@42.165,26.75 ; C55.1@43.789,26.62 C54.1@43.789,27.75
  Top Layer w0.254: v3(31.55,41.255) IC8.1@32.675,41.255 C40.1@32.675,42.155
  PWR Layer w0.203: v3(4.129,11.075) 2.529,12.675 v3(2.529,13.681) 1.746,14.465 1.687,14.524 1.687,17.791 ; v3(39.125,12.875) 39.158,12.908 39.458,12.908 39.764,13.214 39.764,17.325 40.114,17.675 42.453,17.675 42.749,17.97 v3(42.749,19.5) ; v3(42.749,19.5) v3(42.75,25.505) ; v3(42.75,25.505) 42.75,38.25 39.745,41.255 v3(31.55,41.255) 28.619,38.324 5.779,38.324 2.554,35.1 v2(2.554,21.75) 1.687,20.882 1.687,17.988 ; 1.687,17.791 cw(c2.055,17.89) 1.687,17.988 ; 1.687,17.791 cw(c2.055,17.89) 1.687,17.988
pads on no net: IC1.2 IC1.3 IC2.6 IC3.26 IC3.27 IC3.28 IC3.29 IC4.26 IC4.27 IC4.28 IC4.29 IC6.7 IC6.14 IC8.2 IC8.3 IC15.3 J1.40 J1.41 J1.42 J1.43 J1.53 J1.54 J1.55 J1.56 J1.57 J1.58 J1.59 J1.60 J1.62 J1.64 J1.65 J1.66 J1.67 J1.68 J1.69 J1.70 J1.71 J1.72 J1.73 J1.74 J1.75 J1.76 J1.77 J1.78 J1.80 J1.82 J1.83 J1.84 J1.85 J1.86 J1.87 J1.88 J1.89 J1.90 J1.91 J1.92 J1.93 J1.94 J1.95 J1.96 J1.97 J1.98 J1.99 J1.100 J1.101 J1.102 J1.103 J1.104 MCU1_.A4 MCU1_.A5 MCU1_.A8 MCU1_.A9 MCU1_.A13 MCU1_.B1 MCU1_.B5 MCU1_.B8 MCU1_.B9 MCU1_.B10 MCU1_.B13 MCU1_.B16 MCU1_.C5 MCU1_.C7 MCU1_.C8 MCU1_.C9 MCU1_.C12 MCU1_.D2 MCU1_.D3 MCU1_.D4 MCU1_.D5 MCU1_.D7 MCU1_.D8 MCU1_.D9 MCU1_.D10 MCU1_.D11 MCU1_.D12 MCU1_.D15 MCU1_.E1 MCU1_.E3 MCU1_.E10 MCU1_.E13 MCU1_.E14 MCU1_.E15 MCU1_.E16 MCU1_.E17 MCU1_.F1 MCU1_.F3 MCU1_.F4 MCU1_.F13 MCU1_.F14 MCU1_.F17 MCU1_.G1 MCU1_.G2 MCU1_.G3 MCU1_.G4 MCU1_.G17 MCU1_.H1 MCU1_.H2 MCU1_.H3 MCU1_.H4 MCU1_.H16 MCU1_.H17 MCU1_.J4 MCU1_.J5 MCU1_.K1 MCU1_.K3 MCU1_.K16 MCU1_.K17 MCU1_.L1 MCU1_.L2 MCU1_.L3 MCU1_.L16 MCU1_.L17 MCU1_.M1 MCU1_.M2 MCU1_.M4 MCU1_.M16 MCU1_.M17 MCU1_.N2 MCU1_.N3 MCU1_.N4 MCU1_.N6 MCU1_.N13 MCU1_.N14 MCU1_.N15 MCU1_.N17 MCU1_.P2 MCU1_.P3 MCU1_.P4 MCU1_.P5 MCU1_.P6 MCU1_.P8 MCU1_.P11 MCU1_.P12 MCU1_.P13 MCU1_.R1 MCU1_.R2 MCU1_.R3 MCU1_.R5 MCU1_.R6 MCU1_.R7 MCU1_.R9 MCU1_.R11 MCU1_.R12 MCU1_.R13 MCU1_.R15 MCU1_.T1 MCU1_.T2 MCU1_.T3 MCU1_.T4 MCU1_.T5 MCU1_.T6 MCU1_.T7 MCU1_.T11 MCU1_.T13 MCU1_.T14 MCU1_.T15 MCU1_.T16 MCU1_.U2 MCU1_.U3 MCU1_.U4 MCU1_.U5 MCU1_.U6 MCU1_.U12 MCU1_.U13 MCU1_.U14 S1.9 S3.2 S3.3 S3.7 S3.9 S3.10 S3.11 SW1.1' SW1.2'
copper on no net: | length 223.2
  Top Layer w0.076: v6(15.925,12.6) 17.1,12.6 ; v6(15.925,13.4) 17.1,13.4 ; 16.352,9 17.5,9 17.9,9.4 ; 16.352,9.4 17.1,9.4 ; 16.352,9.8 17.5,9.8 17.9,10.2 ; 16.352,10.2 17.1,10.2 ; 16.352,10.6 17.5,10.6 17.9,11 ; 16.352,11.4 17.5,11.4 17.9,11.8 ; 16.352,12.2 17.5,12.2 17.9,12.6 ; 16.352,13 17.5,13 17.9,13.4 ; 16.352,14.2 17.1,14.2 ; 16.352,15.8 17.1,15.8 ; 16.352,16.2 17.5,16.2 17.9,15.8 ; 16.352,16.6 17.1,16.6 ; 16.352,17 17.5,17 17.9,16.6 ; 16.352,17.4 17.1,17.4 ; 16.352,18.2 17.1,18.2 ; 16.352,19.4 17.5,19.4 17.9,19 ; 16.352,20.6 17.1,20.6 ; 17.9,7.852 17.9,8.6 ; 18.3,7.852 18.3,9 18.7,9.4 ; v1(18.3,9.8) 18.7,10.2 ; v1(18.3,10.6) 18.7,11 ; v1(18.3,11.4) 18.7,11.8 ; v1(18.3,13) 18.7,13.4 ; v1(18.3,13.8) 18.7,14.2 ; v1(18.3,16.2) 18.7,15.8 ; v1(18.3,17) 18.7,16.6 ; v1(18.3,17.8) 18.7,17.4 ; v1(18.3,18.6) 18.7,18.2 ; v1(18.3,19.4) 18.7,19 ; 18.7,7.852 18.7,8.6 ; 19.1,7.852 19.1,9 19.5,9.4 ; v1(19.1,10.6) 19.5,11 ; v1(19.1,11.4) 19.5,11.8 ; v1(19.1,12.2) 19.5,12.6 ; v1(19.1,15.4) 19.5,15 ; v1(19.1,16.2) 19.5,15.8 ; v1(19.1,17) 19.5,16.6 ; v1(19.1,17.8) 19.5,17.4 ; v1(19.1,19.4) 19.5,19 ; 19.5,7.852 19.5,8.6 ; 19.9,7.852 19.9,9 20.3,9.4 ; v1(19.9,9.8) 20.3,10.2 ; v1(19.9,10.6) 20.3,11 ; v7(19.9,15.4) 20.3,15 ; v1(19.9,19.4) 20.3,19 ; v1(19.9,20.2) 20.3,19.8 ; 19.9,22.148 19.9,21 20.3,20.6 ; 20.3,7.852 20.3,8.6 ; 20.3,21.4 20.3,22.148 ; 20.7,7.852 20.7,9 21.1,9.4 ; v1(20.7,9.8) 21.1,10.2 ; v1(20.7,10.6) 21.1,11 ; v7(20.7,11.4) 21.1,11.8 ; 21.1,7.852 21.1,8.6 ; 21.5,7.852 21.5,9 21.9,9.4 ; v1(21.5,9.8) 21.9,10.2 ; v1(21.5,19.4) 21.9,19 ; v1(21.5,20.2) 21.9,19.8 ; v1(22.3,10.6) 22.7,11 ; v1(22.3,19.4) 22.7,19 ; v1(22.3,20.2) 22.7,19.8 ; 22.3,22.148 22.3,21 22.7,20.6 ; 22.7,21.4 22.7,22.148 ; 23.5,10.2 v1(23.9,9.8) ; 23.5,19 v1(23.9,19.4) ; 23.5,19.8 v1(23.9,20.2) ; 23.5,20.6 23.9,21 23.9,22.148 ; 23.5,21.4 23.5,22.148 ; 24.3,18.2 v7(24.7,18.6) ; 24.3,19 v1(24.7,19.4) ; 24.3,20.6 24.7,21 24.7,22.148 ; 25.1,9.4 25.5,9 25.5,7.852 ; 25.1,10.2 v1(25.5,9.8) ; 25.1,11 v1(25.5,10.6) ; 25.1,19 v1(25.5,19.4) ; 25.9,7.852 25.9,8.6 ; 25.9,10.2 v1(26.3,9.8) ; 25.9,11 v1(26.3,10.6) ; 25.9,19 v1(26.3,19.4) ; 25.9,19.8 v1(26.3,20.2) ; 26.7,7.852 26.7,8.6 ; 26.7,9.4 27.1,9 27.1,7.852 ; 26.7,10.2 v1(27.1,9.8) ; 26.7,11 v1(27.1,10.6) ; 26.7,11.8 v7(27.1,11.4) ; 26.7,17.4 v7(27.1,17.8) ; 26.7,18.2 v7(27.1,18.6) ; 26.7,20.6 27.1,21 27.1,22.148 ; 26.7,21.4 26.7,22.148 ; 27.5,7.852 27.5,8.6 ; 27.5,9.4 27.9,9 27.9,7.852 ; 27.5,11.8 v1(27.9,11.4) ; 27.5,17.4 v1(27.9,17.8) ; 27.5,18.2 v1(27.9,18.6) ; 28.3,9.4 28.7,9 28.7,7.852 ; 28.3,10.2 v1(28.7,9.8) ; 28.3,11.8 v1(28.7,11.4) ; 28.3,18.2 v1(28.7,18.6) ; 28.3,19 v1(28.7,19.4) ; 29.1,9.4 29.5,9 30.074,9 30.648,9 31.429,9 ; 29.1,12.6 29.5,12.2 30.648,12.2 ; 29.1,13.4 29.5,13 30.648,13 ; 29.1,14.2 29.5,13.8 30.648,13.8 ; 29.1,15.8 29.5,16.2 30.648,16.2 ; 29.1,18.2 29.5,18.6 30.648,18.6 ; 29.1,20.6 29.5,21 30.648,21 ; 29.9,11.8 30.648,11.8 ; 29.9,12.6 30.648,12.6 ; 29.9,13.4 30.648,13.4 ; 29.9,14.2 30.648,14.2 ; 29.9,15.8 30.648,15.8 ; 29.9,16.6 30.648,16.6 ; 29.9,17.4 30.648,17.4 ; 29.9,18.2 30.648,18.2
  Top Layer w0.127: v2(20.125,26.657) 20.125,27.275 ; 26.175,30.45 26.287,30.562 26.287,30.937 28.1,32.75 28.1,33.645 ; 26.825,30.45 26.825,31 28.5,32.675 28.5,33.645 ; 31.429,9 v2(32.9,9)
  Top Layer w0.203: 24.3,30.45 25.525,30.45 ; v2(25.511,26.875) 25.518,26.882 25.518,27.543 25.525,27.55 ; v2(27.475,26.875) 27.475,27.55
  Top Layer w0.254: v3(24.3,28.76) 24.3,29.65 ; 26.825,25.805 v3(26.825,26.875) 26.825,27.55
  Layer 4 w0.076: 16.352,9.8 v1(18.3,9.8) ; 16.352,10.6 v1(18.3,10.6) ; 16.352,11 18.7,11 v1(19.1,11.4) ; 16.352,11.4 v1(18.3,11.4) ; 16.352,11.8 18.7,11.8 v1(19.1,12.2) ; 16.352,13 v1(18.3,13) ; 16.352,13.8 v1(18.3,13.8) ; 16.352,17 v1(18.3,17) ; 16.352,17.4 18.7,17.4 v1(19.1,17) ; 16.352,17.8 v1(18.3,17.8) ; 16.352,18.2 18.7,18.2 v1(19.1,17.8) ; 16.352,18.6 v1(18.3,18.6) ; 16.352,19.4 v1(18.3,19.4) ; 16.352,19.8 18.7,19.8 v1(19.1,19.4) ; 19.5,7.852 19.5,10.2 v1(19.9,10.6) ; 19.5,22.148 19.5,19.8 v1(19.9,19.4) ; 19.9,7.852 v1(19.9,9.8) ; v1(19.9,20.2) 19.9,22.148 ; 20.7,7.852 v1(20.7,9.8) ; 21.5,7.852 v1(21.5,9.8) ; 21.552,22.929 21.552,22.495 21.9,22.148 21.9,21.338 21.9,19.8 v1(22.3,19.4) ; 21.9,7.852 21.9,10.2 v1(22.3,10.6) ; 23.9,7.852 v1(23.9,9.8) ; v1(23.9,19.4) 24.3,19.8 24.3,22.148 ; v1(23.9,20.2) 23.9,22.148 ; 25.5,7.852 v1(25.5,9.8) ; v1(25.5,10.6) 25.9,10.2 25.9,7.852 ; v1(26.3,10.6) 26.7,10.2 26.7,7.852 ; v1(26.3,19.4) 26.7,19.8 26.7,22.148 ; v1(26.3,20.2) 26.3,22.148 ; v1(27.9,17.8) 28.3,18.2 30.648,18.2 ; v1(27.9,18.6) 28.3,19 30.648,19 ; v1(28.7,9.8) 30.648,9.8 ; v1(28.7,18.6) 30.648,18.6 ; v1(28.7,19.4) 30.648,19.4
  Layer 4 w0.127: 20.125,25.258 21.552,23.831 21.552,22.929
  Layer 5 w0.076: 16.352,15 19.5,15 v7(19.9,15.4) ; v7(27.1,17.8) 27.5,18.2 30.648,18.2 ; v7(27.1,18.6) 27.5,19 30.648,19
  Bottom Layer w0.076: v6(15.925,12.6) 16.663,12.6 16.663,11.854 16.762,11.754 ; v6(15.925,13.4) 16.663,13.4 16.762,13.5 16.762,14.243

## Polygon pours and split planes (outlines as drawn)
GND on Bottom Layer "GND_L06_P000" (solid, pour order 0): 1.27,0 43.73,0 ccw(c43.73,1.27) 45,1.27 45,45.73 ccw(c43.73,45.73) 43.73,47 1.27,47 ccw(c1.27,45.73) 0,45.73 0,1.27 ccw(c1.27,1.27)
VDD_MCU on PWR Layer "VDD_MCU_L03_P002" (solid, pour order 2): 43.73,0 ccw(c43.73,1.27) 45,1.27 45,45.645 ccw(c43.645,45.645) 43.645,47 1.27,47 ccw(c1.27,45.73) 0,45.73 0,1.27 ccw(c1.27,1.27) 1.27,0 3.126,0
GND on GND Layer "GND_L02_P001" (solid, pour order 1): 43.73,0 ccw(c43.73,1.27) 45,1.27 45,45.73 ccw(c43.73,45.73) 43.73,47 1.27,47 ccw(c1.27,45.73) 0,45.73 0,1.27 ccw(c1.27,1.27) 1.27,0
GND on Top Layer "GND_L01_P003" (solid, pour order 3): 1.27,0 43.73,0 ccw(c43.73,1.27) 45,1.27 45,45.73 ccw(c43.73,45.73) 43.73,47 1.27,47 ccw(c1.27,45.73) 0,45.73 0,1.27 ccw(c1.27,1.27)
GND on Layer 4 "GND_L04_P004" (solid, pour order 4): 43.73,0 ccw(c43.73,1.27) 45,1.27 45,45.73 ccw(c43.73,45.73) 43.73,47 1.27,47 ccw(c1.27,45.73) 0,45.73 0,1.27 ccw(c1.27,1.27) 1.27,0 4.04,0
GND on Layer 5 "GND_L05_P005" (solid, pour order 5): 43.73,0 ccw(c43.73,1.27) 45,1.27 45,45.73 ccw(c43.73,45.73) 43.73,47 1.27,47 ccw(c1.27,45.73) 0,45.73 0,1.27 ccw(c1.27,1.27) 1.27,0 3.681,0